# Altium PCB R20_PCBM.PcbDoc (part 2 of 2)
Units mm, origin at the board's own origin, x right, y up, seen from the top; angles counter-clockwise.
Board outline 52 x 61 mm, 4 copper layers (Top Layer, Mid-Layer 1, Mid-Layer 2, Bottom Layer); 64 components, 44 nets, 197 pads, 629 vias.
Unrouted connection lines stored in the file: 1.
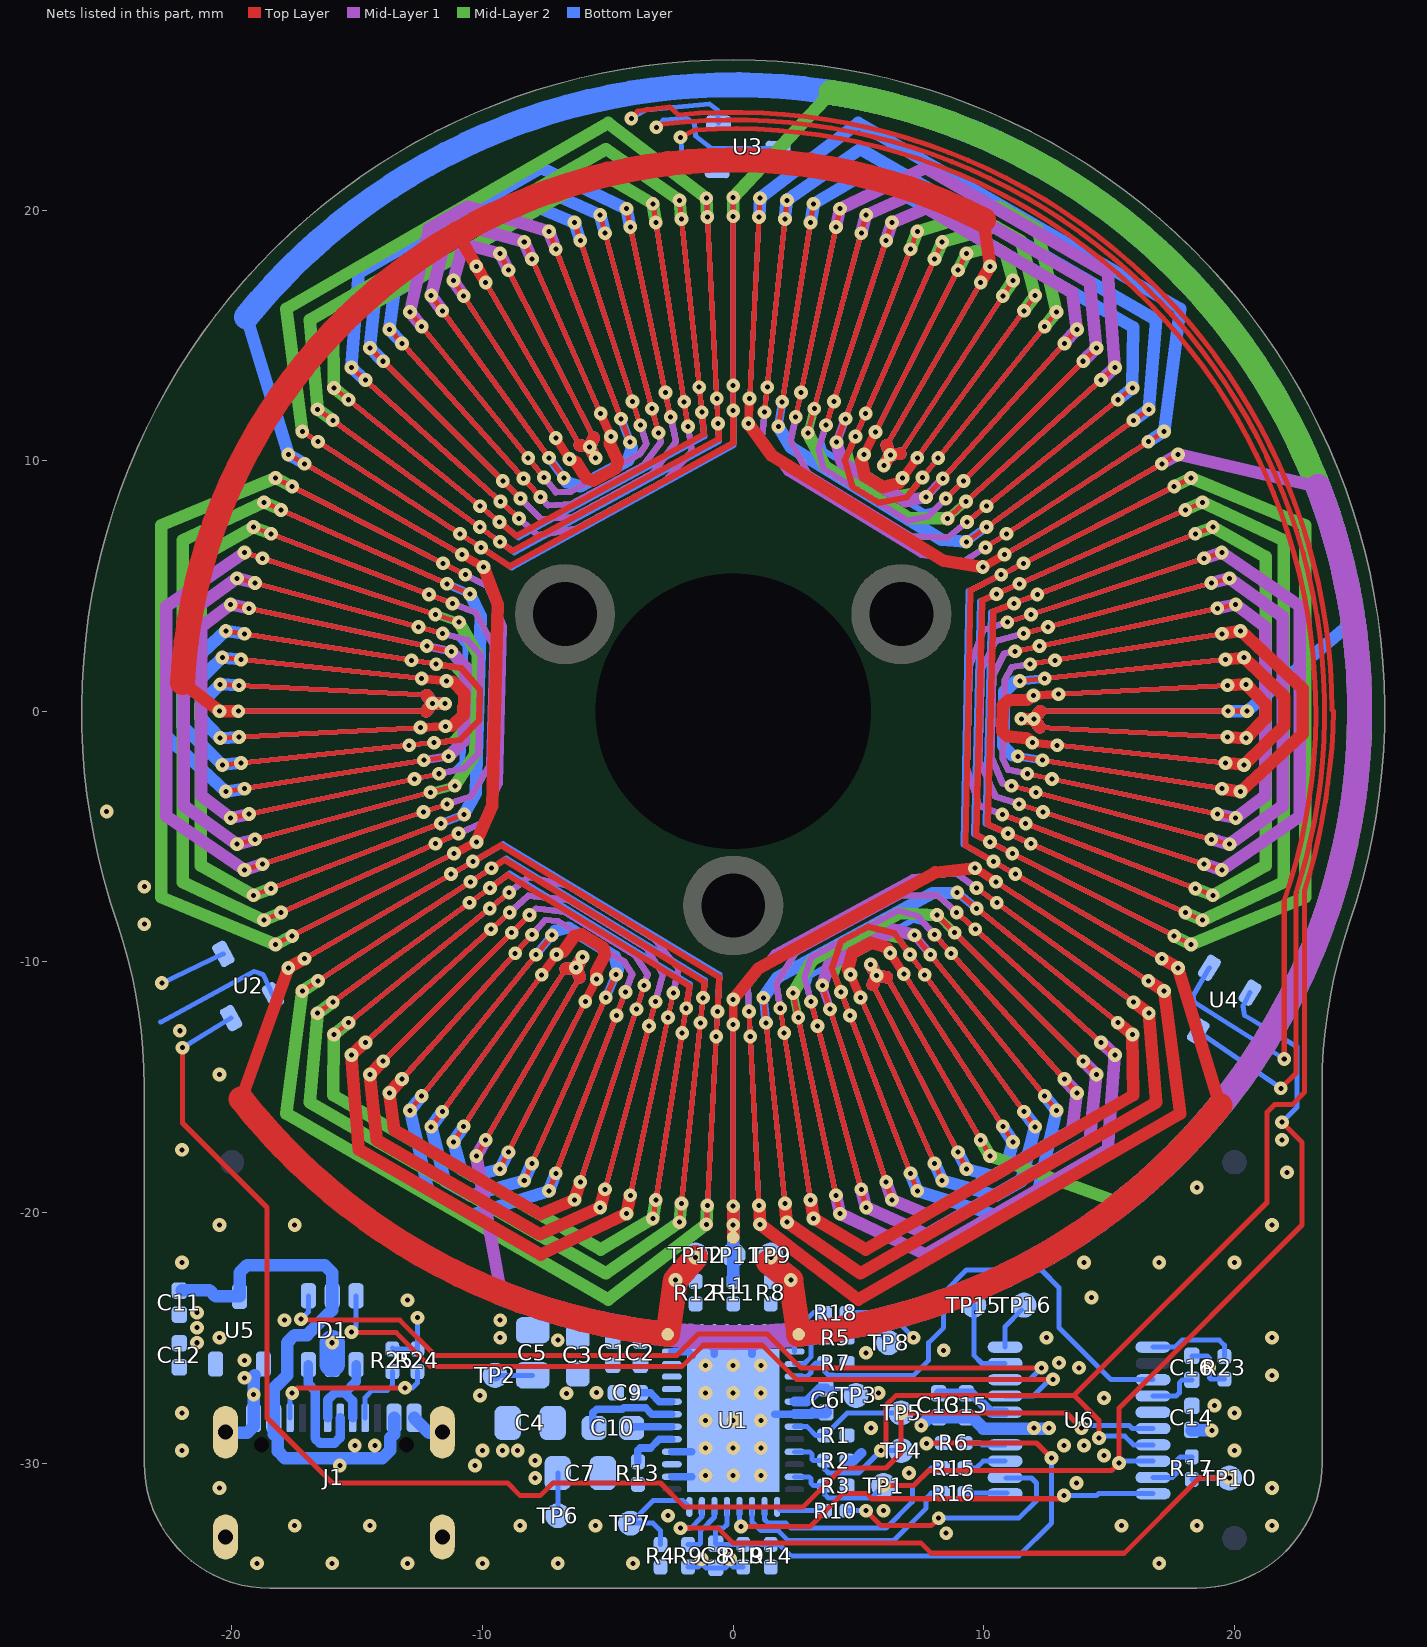
[diagram p4: the nets of this part, all layers, seen from the top]

## Part data
C1 C2 C8: library part C_0402, "0402 cap", LCSC=C307331, Rating=X7R, Voltage=50V
C3: library part C_0603, "0603 cap", LCSC=C15849, Rating=X5R, Voltage=50V
C4 C5 C7: library part C_0805, "0805 cap", LCSC=C440198, Rating=X5R, Voltage=50V
C6 C9: library part C_0402, "0402 cap", LCSC=C52923, Rating=X5R, Voltage=25V
C10: library part C_0603, "0603 cap", LCSC=C1622, Rating=X7R, Voltage=50V
C11: library part C_0402, "0402 cap", LCSC=C52923
C12: library part C_0402, "0402 cap", LCSC=C23733
C13 C14 C16: library part C_0402, "0402 cap", LCSC=C1525
C15: library part C_0402, "0402 cap", LCSC=C15195
D1: "Trans Voltage Suppressor Diode, 5V V(RWM), Unidirectional, 1 Element, Silicon", Clamping Voltage-Max=17V, Manufacturer=STMicroelectronics, Max Operating Temperature=125°C, Min Breakdown Voltage=6V, Min Operating Temperature=-40°C, Package Body Material=Plastic, Package Shape=Rectangular, Package Style="SMALL OUTLINEMeter", Peak Reflow Temperature (Cel)=260°C, Rep Pk Reverse Voltage-Max=5V, Supplier Part Number 1=511-USBLC6-2SC6, Additional Feature="HIGH RELIABILITY", Category="TVS Diodes", ComponentLink1Description=https://datasheet.ciiva.com:443/pdfs/VipMasterIC/IC/SGST/SGSTS30336/SGSTS30336-1.pdf?src-supplier=IHS+Markit, ComponentLink1URL=https://datasheet.ciiva.com:443/pdfs/VipMasterIC/IC/SGST/SGSTS30336/SGSTS30336-1.pdf?src-supplier=IHS+Markit, ComponentLink2Description=https://datasheet.ciiva.com/1268/1690354-1268384.pdf?src-supplier=Element14, ComponentLink2URL=https://datasheet.ciiva.com/1268/1690354-1268384.pdf?src-supplier=Element14, ComponentLink3Description=https://datasheet.ciiva.com/4508/cd00050750-113117-4508433.pdf?src-supplier=Mouser, ComponentLink3URL=https://datasheet.ciiva.com/4508/cd00050750-113117-4508433.pdf?src-supplier=Mouser, ComponentLink4Description=https://datasheet.ciiva.com/15143/getdatasheetpartid-148465-15143789.pdf?src-supplier=Verical, ComponentLink4URL=https://datasheet.ciiva.com/15143/getdatasheetpartid-148465-15143789.pdf?src-supplier=Verical, ComponentLink5Description=https://datasheet.ciiva.com/16200/cd00050750-16200026.pdf?src-supplier=Future+Electronics, ComponentLink5URL=https://datasheet.ciiva.com/16200/cd00050750-16200026.pdf?src-supplier=Future+Electronics, ComponentLink6Description=https://datasheet.ciiva.com/41444/001184109-da-01-en-ic-esd-protecti-usblc6-2sc6-sot-23-6-stm-41444156.pdf?src-supplier=Conrad, ComponentLink6URL=https://datasheet.ciiva.com/41444/001184109-da-01-en-ic-esd-protecti-usblc6-2sc6-sot-23-6-stm-41444156.pdf?src-supplier=Conrad, Diode Element Material=SILICON, Diode Type="TRANS VOLTAGE SUPPRESSOR", JESD-30 Code=R-PDSO-G6, JESD-609 Code=e3, Manufacturer Part Number=USBLC6-2SC6, Moisture Sensitivity Level=1, Number of Elements=1, Pins=6, Polarity=Unidirectional, Pricing 1="1=0.61, 10=0.522, 50=0.522, 100=0.375, 1000=0.258, 10000=0.204 (USD)", Qualification Status="Not Qualified", Reach SVHC Compliant=Yes, Reference Standard=IEC-61000-4-2, RoHS=Yes, RoHS Compliant=Yes, Stock 1=162692, Supplier 1=Mouser, Surface Mount=Yes, Technology=AVALANCHE, Terminal Finish=Tin, Terminal Form="Gull Wing", Terminal Position=DUAL
J1: library part TYPE-C-31-M-12, "Conn USB Type C PL 22 POS 0.5mm Solder ST SMD 22 Terminal 1Port Emboss T/R", LCSC=C165948, Manufacturer="HRO Electronics", Category=Uncategorized, Manufacturer Part Number=TYPE-C-31-M-12, Pricing 1="5=0.1612, 50=0.1282, 150=0.112, 1000=0.0977, 2000=0.0937, 5000=0.0913 (USD)", RoHS=No, Stock 1=6920, Supplier 1=LCSC, Supplier Part Number 1=C165948
L1: library part L_3phase
R1 R2 R3 R4 R5 R6 R7 R9 R18 R19: library part R_0402, "0402 62.5mW", LCSC=C25744
R8 R11 R12: library part R_0402, "0402 62.5mW", LCSC=C17168
R10 R15 R16 R17 R24 R25: library part R_0402, "0402 62.5mW", LCSC=?
R13: library part R_0402, "0402 62.5mW", LCSC=C25092
R14: library part R_0402, "0402 62.5mW", LCSC=C25756
R23: library part R_0402, "0402 62.5mW", LCSC=C11702
TP1 TP2 TP3 TP4 TP5 TP6 TP7 TP8 TP9 TP10 TP11 TP12 TP15 TP16: "1mm testing point"
U1: library part MCT8316ZR, "40-V max, 8-A peak, sensored trapezoidal control 3-phase BLDC motor driver 40-VQFN -40 to 125", Manufacturer="Texas Instruments", Manufacturer Part Number=MCT8316Z0TRGFR, Supplier Part Number=595-MCT8316Z0TRGFR, Category="Integrated Circuits (ICs)", Pricing="1=3.66, 10=3.22, 50=3.22, 100=2.69, 1000=1.94, 10000=1.83 (USD)", RoHS=No, Stock=5280, Supplier=Mouser
U2 U3 U4: "Hall Effect Sensor, -3.7mT Min, 3.7mT Max, 0-20mA, Plastic/epoxy, Rectangular, Surface Mount", LCSC=C2152442, Manufacturer="Texas Instruments", Manufacturer Part Number=DRV5015A3QDBZR, Supplier Part Number=595-DRV5015A3QDBZR, Category="Integrated Circuits (ICs)", ComponentLink1Description=https://www.ti.com:443/lit/ds/symlink/drv5015.pdf?src-supplier=IHS+Markit, ComponentLink1URL=https://www.ti.com:443/lit/ds/symlink/drv5015.pdf?src-supplier=IHS+Markit, ComponentLink2Description=http://www.ti.com/general/docs/suppproductinfo.tsp?distId=10&amp;gotoUrl=http%3A%2F%2Fwww.ti.com%2Flit%2Fgpn%2Fdrv5015&src-supplier=Digikey, ComponentLink2URL=http://www.ti.com/general/docs/suppproductinfo.tsp?distId=10&amp;gotoUrl=http%3A%2F%2Fwww.ti.com%2Flit%2Fgpn%2Fdrv5015&src-supplier=Digikey, JESD-609 Code=e3, Pricing="1=0.25, 10=0.175, 50=0.175, 100=0.154, 1000=0.124, 10000=0.123 (USD)", Reach SVHC Compliant=Yes, RoHS=Yes, RoHS Compliant=Yes, Sensor Type="MAGNETIC FIELD SENSOR,HALL EFFECT", Stock=7485, Supplier=Mouser, Terminal Finish=Tin
U5: library part XC6206P332MR-G, "200mA Fixed 3.3V Positive electrode 6V SOT-23-3L Voltage Regulators - Linear, Low Drop Out (LDO) Regulators ROHS", LCSC=C5446
U6: library part STM32F042F6P6TR, "32KB 1.65V~3.6V ARM-M0 48MHz 16 TSSOP-20(4.4x6.5) Microcontrollers (MCU/MPU/SOC) ROHS", LCSC=C2969989

## Free pads (board coordinates)
  round 0 hole 11 unplated: A3(0,0)
  round 4 hole 2.55: M(-6.712,3.875) M(0,-7.75) M(6.712,3.875)

## Via types
v1: diameter 0.55, hole 0.2, Top Layer to Bottom Layer, 614 vias
v2: diameter 0.55, hole 0.2, Top Layer to Bottom Layer, tented top, 15 vias

## Nets (pads, with @x,y where several pads share a name; then routed paths per layer and width w, separated by ;. In a path a pad name is that pad's centre, name@x,y a point inside that pad or via, vN(x,y) a via of type N, cw(c..) or ccw(c..) an arc to the next point about the centre after c; other vN are vias at no path point)
+3V3: C12.2 C13.2 C14.2 C15.2 R1.2 R2.2 R3.2 R4.2 R5.2 R7.2 R14.2 U2.1 U3.1 U4.1 U5.2 U6.5 U6.16 | length 70.2
  Top Layer w0.2: v1(-2.105,22.903) -1.521,23.2 cw(c0,0) 21.989,-7.553 v1(21.989,-13.874)
  Bottom Layer w0.2: -22.849,-12.406 -19.114,-10.378 -18.759,-10.505 U2.1@-18.366,-11.337 ; v1(-2.105,22.903) -2.013,21.908 -1.706,21.683 U3.1@-0.635,21.574 ; U4.1@19.001,-10.237 18.351,-11.347 18.395,-11.606 v1(21.989,-13.874)
  Bottom Layer w0.4: R2.2@4.55,-29.9 4.816,-29.9 5.125,-29.592 ; C13.2@8.2,-27.22 C15.2@9.3,-27.22 9.52,-27.22 10.275,-27.975 U6.16@10.85,-27.975
  other v1: -19,-34 -16,-34 -13,-34 -10,-34 -7,-34 -4,-34 17,-34 -20.5,-31 21.5,-31 7.012,-30.402 5.5,-28.6 -22,-28 20,-28 19.2,-27.7 14.8,-27.4 5.8,-27.2 13.8,-26.2 5.3,-25.6 8.4,-25.5 -20.5,-25 12.5,-25 21.5,-25 14.3,-23.4 -22,-22 14,-22 17,-22 20,-22 18.5,-19 22.1,-18.4 -23.5,-7 -25,-4
+AVDD: C6.2 TP3.1 U1.25 | length 2.8
  Bottom Layer w0.2: C6.2@3.7,-27.02 4.62,-27.02 TP3.1@4.9,-27.3
  Bottom Layer w0.4: U1.25@2.45,-27.55 2.93,-27.55 3.46,-27.02 C6.2@3.7,-27.02
+VBUS: C1.2 C2.2 C3.2 C4.2 C5.2 C9.1 C11.2 D1.5 J1.A4B9 J1.B4A9 TP2.1 U1.9 U1.10 U1.11 U5.3 | length 23.3
  Bottom Layer w0.2: TP2.1@-9.5,-26.5 C5.2@-8,-26.5
  Bottom Layer w0.5: C11.2@-22,-23.1 -20.9,-23.1 -20.65,-23.35 U5.3@-19.7,-23.35 -19.7,-22.4 -19.4,-22.1 -16.3,-22.1 -16,-22.4 D1.5@-16,-23.325 -16,-23.9 -17,-24.9 -17.5,-24.9 -17.8,-25.2 -17.8,-26.5 -18.334,-27.034 J1.B4A9@-18.334,-28.2 -18.334,-28.841 -18.174,-29.001 -18.174,-29.526 -17.9,-29.8 -14,-29.8 -13.694,-29.494 -13.694,-29.001 -13.534,-28.841 J1.A4B9@-13.534,-28.2
  other v1: -15.7,-30.1 -10.3,-30.1 -15.1,-29.3 -14.3,-29.3 -10.1,-27.3 -6.647,-27.219 -5.456,-27.193
A: L1.A R12.2 TP12.1 | length 3.4
  Top Layer w1: L1.A@-2.613,-24.863 v1(-2.3,-22.7) v1(-1.5,-21.8)
B: L1.B R11.2 TP11.1 | length 2.9
  Bottom Layer w0.5: R11.2@0,-22.75 TP11.1@0,-21.7 0,-21 0,-19.8
BRAKE: R9.2 U1.38 | length 2.2
  Bottom Layer w0.2: R9.2@-1.8,-33.25 -1.35,-33.25 -1.3,-33.2 -1.3,-32.7 -0.75,-32.15 U1.38@-0.75,-31.75
C: L1.C R8.2 TP9.1 | length 3.3
  Top Layer w1: v1@1.406,-21.987 v1(2.3,-22.7) L1.C@2.613,-24.863
  other v1: 1.5,-21.8 0,-20.5 -1.073,-20.472 1.073,-20.472 -2.143,-20.388 2.143,-20.388 -3.207,-20.248 3.207,-20.248 -4.262,-20.052 4.262,-20.052 -5.306,-19.801 5.306,-19.801 0,-19.75 -1.034,-19.723 1.034,-19.723 -2.064,-19.642 2.064,-19.642 -6.335,-19.497 -3.09,-19.507 3.09,-19.507 6.335,-19.497 -4.106,-19.318 4.106,-19.318 -7.347,-19.138 7.347,-19.138 -5.112,-19.077 5.112,-19.077 -6.103,-18.783 6.103,-18.783 -8.338,-18.728 8.338,-18.728 -7.078,-18.438 7.078,-18.438 -9.307,-18.266 9.307,-18.266 -8.033,-18.042 8.033,-18.042 -10.25,-17.754 10.25,-17.754 -8.966,-17.597 8.966,-17.597 -11.165,-17.193 11.165,-17.193 -9.875,-17.104 9.875,-17.104 -12.05,-16.585 12.05,-16.585 -10.757,-16.564 10.757,-16.564 -11.609,-15.978 11.609,-15.978 -12.901,-15.931 12.901,-15.931 -12.429,-15.349 12.429,-15.349 -13.717,-15.234 13.717,-15.234 -13.215,-14.677 13.215,-14.677 -14.496,-14.496 14.496,-14.496 -13.965,-13.965 13.965,-13.965 -15.234,-13.717 15.234,-13.717 -14.677,-13.215 14.677,-13.215 -0.68,-12.982 0.68,-12.982 -15.931,-12.901 15.931,-12.901 -2.034,-12.84 2.034,-12.84 -3.365,-12.557 3.365,-12.557 0,-12.5 -15.349,-12.429 -1.307,-12.431 1.307,-12.431 15.349,-12.429 -2.599,-12.227 2.599,-12.227 -4.659,-12.137 4.659,-12.137 -16.585,-12.05 16.585,-12.05 -0.628,-11.984 0.628,-11.984 -3.863,-11.888 3.863,-11.888 -1.877,-11.852 1.877,-11.852 -15.978,-11.609 15.978,-11.609 -5.902,-11.583 -3.106,-11.591 3.106,-11.591 0,-11.5 -5.084,-11.419 -1.202,-11.437 1.202,-11.437 5.084,-11.419 -2.391,-11.249 2.391,-11.249 -4.3,-11.203 4.3,-11.203 -17.193,-11.165 17.193,-11.165 -3.554,-10.937 3.554,-10.937 -16.564,-10.757 16.564,-10.757 -5.448,-10.692 5.726,-10.546 -7.641,-10.517 -4.677,-10.506 4.677,-10.506 7.641,-10.517 6.808,-10.483 -17.754,-10.25 17.754,-10.25 -6.27,-10.232 5.487,-10.106 -17.104,-9.875 17.104,-9.875 -6.009,-9.805 -7.866,-9.714 -7.053,-9.708 7.053,-9.708 7.866,-9.714 -8.699,-9.661 6.263,-9.645 8.699,-9.661 -18.266,-9.307 18.266,-9.307 -17.597,-8.966 17.597,-8.966 -7.237,-8.937 7.237,-8.937 -8.03,-8.918 8.03,-8.918 -8.839,-8.839 8.839,-8.839 -9.661,-8.699 9.661,-8.699 -18.728,-8.338 18.728,-8.338 -8.132,-8.132 8.132,-8.132 -18.042,-8.033 -8.918,-8.03 8.918,-8.03 18.042,-8.033 -9.714,-7.866 9.714,-7.866 -10.517,-7.641 10.517,-7.641 -19.138,-7.347 19.138,-7.347 -8.937,-7.237 8.937,-7.237 -18.438,-7.078 18.438,-7.078 -9.708,-7.053 9.708,-7.053 -10.483,-6.808 10.483,-6.808 -11.258,-6.5 11.258,-6.5 -19.497,-6.335 19.497,-6.335 -9.645,-6.263 9.645,-6.263 -18.783,-6.103 18.783,-6.103 -10.392,-6 10.392,-6 -11.138,-5.675 11.138,-5.675 -19.801,-5.306 19.801,-5.306 -11.876,-5.288 11.876,-5.288 -10.247,-5.221 10.247,-5.221 -19.077,-5.112 19.077,-5.112 -10.963,-4.881 10.963,-4.881 -11.67,-4.48 11.67,-4.48 -20.052,-4.262 20.052,-4.262 -19.318,-4.106 -10.736,-4.121 10.736,-4.121 19.318,-4.106 -12.364,-4.017 12.364,-4.017 -11.413,-3.708 11.413,-3.708 -12.074,-3.235 12.074,-3.235 -20.248,-3.207 20.248,-3.207 -19.507,-3.09 19.507,-3.09 -11.108,-2.976 11.108,-2.976 -12.716,-2.703 12.716,-2.703 -11.738,-2.495 11.738,-2.495 -20.388,-2.143 20.388,-2.143 -19.642,-2.064 19.642,-2.064 -12.346,-1.955 12.346,-1.955 -11.358,-1.799 11.358,-1.799 -12.929,-1.359 12.929,-1.359 -11.934,-1.254 11.934,-1.254 -20.472,-1.073 20.472,-1.073 -19.723,-1.034 19.723,-1.034 -12.483,-0.654 -11.484,-0.602 11.496,-0.301 11.996,-0.314 -20.5,0 -19.75,0 19.75,0 20.5,0 -11.996,0.314 -11.496,0.301 11.984,0.628 12.982,0.68 -19.723,1.034 19.723,1.034 -20.472,1.073 20.472,1.073 -11.437,1.202 11.437,1.202 -12.431,1.307 12.431,1.307 -11.852,1.877 11.852,1.877 -12.84,2.034 12.84,2.034 -19.642,2.064 19.642,2.064 -20.388,2.143 20.388,2.143 -11.249,2.391 11.249,2.391 -12.227,2.599 12.227,2.599 -19.507,3.09 -11.591,3.106 11.591,3.106 19.507,3.09 -20.248,3.207 20.248,3.207 -12.557,3.365 12.557,3.365 -10.937,3.554 10.937,3.554 -11.888,3.863 11.888,3.863 -19.318,4.106 19.318,4.106 -20.052,4.262 20.052,4.262 -11.203,4.3 11.203,4.3 -12.137,4.659 12.137,4.659 -10.506,4.677 10.506,4.677 -11.419,5.084 11.419,5.084 -19.077,5.112 19.077,5.112 -19.801,5.306 19.801,5.306 -10.692,5.448 10.692,5.448 -9.959,5.75 9.959,5.75 -11.583,5.902 11.583,5.902 -18.783,6.103 18.783,6.103 -10.825,6.25 10.825,6.25 -19.497,6.335 19.497,6.335 -10.064,6.536 10.064,6.536 -9.304,6.76 9.304,6.76 -18.438,7.078 -10.903,7.08 10.903,7.08 18.438,7.078 -19.138,7.347 -10.113,7.347 10.113,7.347 19.138,7.347 -9.326,7.552 9.326,7.552 -8.546,7.695 8.546,7.695 -18.042,8.033 18.042,8.033 -10.103,8.181 10.103,8.181 -18.728,8.338 18.728,8.338 -9.289,8.364 9.289,8.364 -8.485,8.485 8.485,8.485 -7.695,8.546 7.695,8.546 -17.597,8.966 17.597,8.966 -9.192,9.192 9.192,9.192 -18.266,9.307 -8.364,9.289 -6.76,9.304 6.76,9.304 8.364,9.289 18.266,9.307 -7.552,9.326 7.552,9.326 6.009,9.805 -17.104,9.875 17.104,9.875 -6.536,10.064 -8.181,10.103 -7.347,10.113 -5.487,10.106 7.347,10.113 8.181,10.103 5.221,10.247 6.27,10.232 -17.754,10.25 17.754,10.25 -5.726,10.546 -16.564,10.757 -4.121,10.736 4.121,10.736 16.564,10.757 -7.08,10.903 -4.881,10.963 4.881,10.963 -2.976,11.108 2.976,11.108 5.675,11.138 -17.193,11.165 17.193,11.165 -1.799,11.358 1.799,11.358 -3.708,11.413 3.708,11.413 -0.602,11.484 0.602,11.484 -15.978,11.609 15.978,11.609 -4.48,11.67 4.48,11.67 -2.495,11.738 2.495,11.738 -5.288,11.876 5.288,11.876 -1.254,11.934 1.254,11.934 0,12 -16.585,12.05 16.585,12.05 -3.235,12.074 3.235,12.074 -1.955,12.346 1.955,12.346 -4.017,12.364 4.017,12.364 -15.349,12.429 15.349,12.429 -0.654,12.483 0.654,12.483 -2.703,12.716 2.703,12.716 -15.931,12.901 15.931,12.901 -1.359,12.929 1.359,12.929 0,13 -14.677,13.215 14.677,13.215 -15.234,13.717 15.234,13.717 -13.965,13.965 13.965,13.965 -14.496,14.496 14.496,14.496 -13.215,14.677 13.215,14.677 -13.717,15.234 13.717,15.234 -12.429,15.349 12.429,15.349 -12.901,15.931 12.901,15.931 -11.609,15.978 11.609,15.978 -10.757,16.564 10.757,16.564 -12.05,16.585 12.05,16.585 -9.875,17.104 9.875,17.104 -11.165,17.193 11.165,17.193 -8.966,17.597 8.966,17.597 -10.25,17.754 10.25,17.754 -8.033,18.042 8.033,18.042 -9.307,18.266 9.307,18.266 -7.078,18.438 7.078,18.438 -8.338,18.728 8.338,18.728 -6.103,18.783 6.103,18.783 -5.112,19.077 5.112,19.077 -7.347,19.138 7.347,19.138 -4.106,19.318 4.106,19.318 -6.335,19.497 -3.09,19.507 3.09,19.507 6.335,19.497 -2.064,19.642 2.064,19.642 -1.034,19.723 1.034,19.723 0,19.75 -5.306,19.801 5.306,19.801 -4.262,20.052 4.262,20.052 -3.207,20.248 3.207,20.248 -2.143,20.388 2.143,20.388 -1.073,20.472 1.073,20.472 0,20.5
DRVOFF: R18.2 U1.21 | length 2.3
  Bottom Layer w0.2: U1.21@2.45,-25.55 2.45,-24.75 3.2,-24 R18.2@3.65,-24
FGOUT: R4.1 TP7.1 U1.40 | length 4.7
  Bottom Layer w0.2: R4.1@-2.9,-33.25 -2.9,-32.7 -3.2,-32.4 TP7.1@-4.1,-32.4 -3.2,-31.5 -2,-31.5 U1.40@-1.75,-31.75
GND: C1.1 C2.1 C3.1 C4.1 C5.1 C6.1 C7.1 C8.1 C11.1 C12.1 C13.1 C14.1 C15.1 C16.1 D1.2 J1.A1B12 J1.B1A12 J1.M1 R9.1 R18.1 R19.1 R23.1 R24.1 R25.1 TP6.1 U1.2 U1.4 U1.12 U1.15 U1.18 U1.26 U1.41 U2.3 U3.3 U4.3 U5.1 U6.15 | length 97.9
  Top Layer w0.2: v1(-3.067,23.299) -2.774,23.436 cw(c0,0) 23.313,-3.671 cw(c0.252,-0.04) 22.467,-7.215 22.467,-14.433 v1(21.852,-15.048)
  Bottom Layer w0.2: v1(-22.8,-10.849) U2.3@-20.346,-9.681 ; R25.1@-13.6,-25.4 -13.55,-25.45 R24.1@-12.6,-25.45 ; R24.1@-12.6,-25.4 v1(-12.6,-24.2) ; TP6.1@-7,-32.1 C7.1@-7,-30.4 ; v1(-3.067,23.299) -2.792,23.585 -1.863,23.677 -1.537,23.45 -1.504,22.951 -0.883,22.483 U3.3@1.789,22.461 ; R9.1@-1.8,-34.15 -1.4,-34.15 -1.267,-34.017 v1(-1.267,-33.826) ; v1@-1.225,-34.05 -1.095,-34.18 C8.1@-0.7,-34.18 -0.305,-34.18 v1@-0.175,-34.05 ; v1(-0.133,-33.826) -0.133,-34.017 0,-34.15 R19.1@0.4,-34.15 ; R18.1@4.55,-24 6.2,-24 v1(7.2,-25) ; C16.1@18.3,-25.72 18.92,-25.72 19,-25.8 v1(19,-26.2) 19,-26.6 19.05,-26.65 R23.1@19.6,-26.65 ; U4.3@18.557,-12.779 v1(21.852,-15.048)
  Bottom Layer w0.3: U1.2@-2.45,-30.55 U1.41@-1.65,-30.55 ; U1.4@-2.45,-29.55 U1.41@-1.65,-29.55 ; U1.12@-2.45,-25.55 -1.79,-25.55 U1.41@-1.626,-25.714 ; U1.41@-0.75,-25.65 U1.15@-0.75,-24.85 ; U1.41@0.75,-25.65 U1.18@0.75,-24.85 ; U1.41@1.65,-28.05 U1.26@2.45,-28.05
  Bottom Layer w0.4: U1.26@2.45,-28.05 3.137,-28.05 3.207,-27.98 3.278,-27.98
  Bottom Layer w0.5: J1.M1@-20.3,-28.8 -19.4,-28.8 -19.134,-28.534 J1.B1A12@-19.134,-28.2 -19.134,-26.534 -19.1,-26.5 ; J1.A1B12@-12.734,-28.2 -12.134,-28.8 J1.M1@-11.5,-28.8 ; 3.278,-27.98 C6.1@3.7,-27.98 ; v1(7.5,-28.5) 7.82,-28.18 C13.1@8.2,-28.18 C15.1@9.3,-28.18 9.54,-28.18 9.985,-28.625 U6.15@10.85,-28.625 12.575,-28.625 v1(12.6,-28.6) ; C14.1@18.3,-28.7 v1(19.1,-28.7)
  Bottom Layer w1: D1.2@-16,-26.075 v1(-16,-25.2)
  other v1: 8.5,-32.8 -17.5,-32.5 -14.5,-32.5 -8.5,-32.5 -5.5,-32.5 15.5,-32.5 18.5,-32.5 21.5,-32.5 -2.6,-32.1 6,-31.9 13.7,-30.8 -7.9,-30.6 -7.9,-29.9 14.8,-29.7 -22,-29.5 -10,-29.5 -9.2,-29.5 -8.6,-29.5 20,-29.5 13.2,-29.3 14,-29.3 12,-28.6 -19.136,-27.268 -19.5,-26.6 21.5,-26.5 13,-26 -19.5,-25.9 -21.4,-25.2 -7,-25.1 -9.3,-25 -21.4,-24.6 -17.9,-24.3 -9.3,-24.3 -21.4,-24 -13,-23.5 -20.5,-20.5 -17.5,-20.5 21.5,-20.5 -22,-17.5 21.9,-17.1 -20.5,-14.5 -22.084,-12.75 -23.5,-8.5
  other v2: -1.1,-30.5 0,-30.5 1.1,-30.5 -1.1,-29.4 0,-29.4 1.1,-29.4 -1.1,-28.3 0,-28.3 1.1,-28.3 -1.1,-27.2 0,-27.2 1.1,-27.2 -1.1,-26.1 0,-26.1 1.1,-26.1
HALL_A: R1.1 TP5.1 U1.27 U2.2 U6.6 | length 63.3
  Top Layer w0.2: v1(-21.972,-13.427) -21.972,-16.428 -18.6,-19.8 -18.6,-28.2 -16,-30.8 -9,-30.8 -8.5,-31.3 -7.7,-31.3 -7.2,-30.8 -2.9,-30.8 -1.95,-31.75 2.8,-31.75 4.35,-30.2 6.1,-30.2 6.7,-29.6 6.7,-28.7 v1(6.7,-28) 13.3,-28 v1(13.9,-28.6)
  Bottom Layer w0.2: v1(-21.972,-13.427) U2.2@-20.036,-12.244 ; U1.27@2.45,-28.55 2.95,-28.55 3.3,-28.9 R1.1@3.65,-28.9 4.55,-28 v1(6.7,-28) ; v1(13.9,-28.6) 14,-28.5 15.8,-28.5 15.925,-28.625 U6.6@16.75,-28.625
HALL_B: R2.1 TP4.1 U1.29 U3.2 U6.7 | length 97
  Top Layer w0.2: v1(-4.064,23.653) -3.794,23.951 -2.535,24.117 -2.188,23.8 cw(c0,0) 23.9,0.05 23.95,0 cw(c5.312,0) 23.725,-2.889 cw(c0,0) 22.8,-7.167 22.8,-15.204 22.304,-15.7 21.6,-15.7 21.3,-16 21.3,-19.6 13.6,-27.3 ; v1(5.9,-29.5) 6.1,-29.3 6.1,-27.7 6.5,-27.3 13.6,-27.3 ; v1(14.6,-29) 14.6,-28.3 13.6,-27.3
  Bottom Layer w0.2: v1(-4.064,23.653) -3.48,23.999 -0.952,24.231 -0.628,23.992 U3.2@-0.586,23.473 ; U1.29@2.45,-29.55 3.047,-29.55 3.15,-29.653 3.15,-29.85 3.2,-29.9 R2.1@3.65,-29.9 3.65,-30.25 3.8,-30.4 5,-30.4 v1(5.9,-29.5) TP4.1@6.7,-29.5 ; v1(14.6,-29) 14.675,-28.925 15.625,-28.925 15.975,-29.275 U6.7@16.75,-29.275
HALL_C: R3.1 TP1.1 U1.31 U4.2 U6.8 | length 39.2
  Top Layer w0.2: v1(6,-30.9) 7.2,-30.9 7.8,-30.3 15.1,-30.3 v1(15.4,-30) 15.4,-27.8 22.7,-20.5 22.7,-17.2 v1(21.9,-16.4)
  Bottom Layer w0.2: U1.31@2.45,-30.55 3.025,-30.55 3.1,-30.625 3.1,-30.8 3.2,-30.9 R3.1@3.65,-30.9 3.65,-31.25 3.8,-31.4 5.5,-31.4 v1(6,-30.9) ; v1(15.4,-30) 15.475,-29.925 U6.8@16.75,-29.925 ; U4.2@20.621,-11.229 20.352,-11.75 20.411,-12.143 22.499,-13.386 22.499,-15.801 v1(21.9,-16.4)
ILIM: C8.2 R6.1 R14.1 R19.2 U1.37 | length 24.4
  Top Layer w0.2: v1(7.712,-29.216) 7.728,-29.2 12.1,-29.2 v1(12.7,-29.8)
  Bottom Layer w0.2: U1.37@-0.25,-31.75 -0.25,-32.45 -0.4,-32.6 -0.6,-32.6 -0.7,-32.7 C8.2@-0.7,-33.22 -0.67,-33.25 R19.2@0.4,-33.25 R14.1@1.5,-33.25 1.85,-33.25 2.3,-33.7 11.4,-33.7 12.7,-32.4 v1(12.7,-29.8) ; v1(7.712,-29.216) 8.334,-29.216 R6.1@8.35,-29.2
ILIM_MCU: R6.2 U6.14 | length 1.6
  Bottom Layer w0.2: R6.2@9.25,-29.2 9.85,-29.2 9.925,-29.275 U6.14@10.85,-29.275
NetC7_2: C7.2 R13.2 U1.3
NetC9_2: C9.2 U1.8 | length 1.4
  Bottom Layer w0.3: C9.2@-3.7,-27.2 -3.3,-27.2 -2.95,-27.55 U1.8@-2.45,-27.55
NetC10_1: C10.1 U1.6 | length 1.6
  Bottom Layer w0.3: C10.1@-4,-28.6 -3.95,-28.55 U1.6@-2.45,-28.55
NetC10_2: C10.2 U1.7 | length 3.9
  Bottom Layer w0.3: C10.2@-5.6,-28.6 -5.6,-28 -5.45,-27.85 -4.419,-27.85 -4.369,-27.8 -3.5,-27.8 -3.25,-28.05 U1.7@-2.45,-28.05
NetC16_2: C16.2 U6.4 | length 2.1
  Bottom Layer w0.2: U6.4@16.75,-27.325 17.675,-27.325 17.8,-27.2 17.8,-26.8 17.92,-26.68 C16.2@18.3,-26.68
NetD1_1: D1.1 J1.A7 J1.B7 | length 4
  Bottom Layer w0.381: J1.A7@-16.184,-28.2 -16.184,-27.484 -15.9,-27.2 -15.5,-27.2 ; J1.B7@-15.184,-28.2 -15.184,-27.516 -15.5,-27.2 ; D1.1@-15.05,-26.075 -15.05,-26.75 -15.5,-27.2
NetD1_3: D1.3 J1.A6 J1.B6 | length 5
  Bottom Layer w0.381: D1.3@-16.95,-26.075 -16.95,-26.85 -16.684,-27.116 J1.B6@-16.684,-28.2 -16.684,-29.016 -16.5,-29.2 -15.9,-29.2 -15.684,-28.984 J1.A6@-15.684,-28.2
NetJ1_A5: J1.A5 R25.2 | length 2.7
  Bottom Layer w0.2: J1.A5@-14.684,-28.2 -14.684,-27.384 -14.4,-27.1 -13.8,-27.1 -13.6,-26.9 R25.2@-13.6,-26.35
NetJ1_B5: J1.B5 R24.2 | length 6.7
  Top Layer w0.2: v1(-17.6,-27.2) -17.4,-27 v1(-13.1,-27)
  Bottom Layer w0.2: J1.B5@-17.684,-28.2 -17.684,-27.284 v1(-17.6,-27.2) ; v1(-13.1,-27) -12.8,-27 -12.6,-26.8 R24.2@-12.6,-26.35
NetR8_1: R8.1 U1.19 U1.20
NetR10_1: R10.1 U1.33 | length 2
  Bottom Layer w0.2: U1.33@1.75,-31.75 1.9,-31.9 R10.1@3.65,-31.9
NetR11_1: R11.1 U1.16 U1.17
NetR12_1: R12.1 U1.13 U1.14
NetR13_1: R13.1 U1.5 | length 2
  Bottom Layer w0.3: R13.1@-3.8,-29.95 -3.8,-29.5 -3.7,-29.4 -3.3,-29.4 -2.95,-29.05 U1.5@-2.45,-29.05
NetR15_1: R15.1 U6.13 | length 1.7
  Bottom Layer w0.2: R15.1@9.25,-30.2 9.7,-30.2 9.975,-29.925 U6.13@10.85,-29.925
NetR16_1: R16.1 U6.11 | length 1.7
  Bottom Layer w0.2: R16.1@9.25,-31.2 9.7,-31.2 U6.11@10.915,-31.2
NetR17_1: R17.1 U6.9 | length 2.2
  Bottom Layer w0.2: U6.9@16.75,-30.575 17.525,-30.575 17.7,-30.4 17.7,-29.9 17.85,-29.75 R17.1@18.3,-29.75
NetR23_2: R23.2 U6.1 | length 3.5
  Bottom Layer w0.2: U6.1@16.75,-25.375 17.625,-25.375 17.9,-25.1 19.4,-25.1 19.6,-25.3 R23.2@19.6,-25.75
nFAULT: R5.1 TP8.1 U1.22 | length 5.1
  Bottom Layer w0.2: U1.22@2.45,-26.05 2.826,-26.05 3.1,-25.776 3.1,-25.2 3.2,-25.1 R5.1@3.65,-25.1 ; R5.1@3.65,-25 3.65,-24.75 3.9,-24.5 5.5,-24.5 TP8.1@6.2,-25.2
nSCS: U1.36 U6.10 | length 18
  Top Layer w0.2: v1(0.313,-32.537) 3.063,-32.537 4.375,-31.225 4.875,-31.225 5.325,-31.225 5.525,-31.425 13.075,-31.425 v1(13.2,-31.3)
  Bottom Layer w0.2: U1.36@0.25,-31.75 0.25,-32.35 0.375,-32.475 v1(0.313,-32.537) ; v1(13.2,-31.3) 14.5,-31.3 14.575,-31.225 U6.10@16.75,-31.225
nSLEEP: R7.1 U1.23 U6.3 | length 20.8
  Bottom Layer w0.2: U1.23@2.45,-26.55 2.95,-26.55 3.1,-26.4 3.1,-26.2 3.3,-26 R7.1@3.65,-26 3.65,-26.35 3.79,-26.49 4.002,-26.49 4.012,-26.5 7.2,-26.5 7.8,-25.9 7.8,-25.2 8.4,-24.6 8.4,-23.2 9.3,-22.3 12.3,-22.3 13,-23 13,-24.6 15.075,-26.675 U6.3@16.75,-26.675
PWM: R17.2 TP10.1 U1.39 | length 26.5
  Top Layer w0.2: v1(-2.1,-32.6) -0.6,-32.6 0,-33.2 7.5,-33.2 7.9,-33.6 15.6,-33.6 18.6,-30.6 v1(19.8,-30.6)
  Bottom Layer w0.2: v1(-2.1,-32.6) -1.7,-32.6 -1.25,-32.15 U1.39@-1.25,-31.75 ; R17.2@18.3,-30.65 18.35,-30.6 v1(19.8,-30.6)
SCLK: R16.2 U1.35 | length 9.5
  Bottom Layer w0.2: U1.35@0.75,-31.75 0.75,-32.35 1.1,-32.7 1.8,-32.7 2.2,-33.1 6.4,-33.1 7.7,-31.8 7.7,-31.4 7.9,-31.2 R16.2@8.35,-31.2
SDI: R15.2 U1.34 | length 9.1
  Bottom Layer w0.2: U1.34@1.25,-31.75 1.25,-32.25 1.4,-32.4 2.1,-32.4 2.3,-32.6 5.5,-32.6 6.1,-32.6 7.15,-31.55 7.15,-30.95 7.9,-30.2 R15.2@8.35,-30.2
SDO: R10.2 U6.12 | length 10.2
  Top Layer w0.2: v1(5.3,-31.9) 5.9,-32.5 7.9,-32.5 v1(8.2,-32.2)
  Bottom Layer w0.2: R10.2@4.55,-31.9 v1(5.3,-31.9) ; v1(8.2,-32.2) 11.4,-32.2 12.1,-31.5 12.1,-30.8 11.9,-30.6 U6.12@10.876,-30.6
SWCLK: TP16.1 U6.20 | length 1.7
  Bottom Layer w0.2: U6.20@10.85,-25.375 10.85,-24.55 TP16.1@11.5,-23.9
SWDIO: TP15.1 U6.19 | length 3.4
  Bottom Layer w0.2: TP15.1@9.6,-23.7 9.6,-25.7 9.925,-26.025 U6.19@10.85,-26.025
USB_D_N: D1.6 U6.17 | length 33.3
  Top Layer w0.2: v1(-15.235,-24.775) -15.235,-24.8 -13.442,-24.8 -12.088,-26.154 -2.054,-26.154 -1.2,-25.3 1.158,-25.3 2.518,-26.66 12.088,-26.66 12.103,-26.675 12.497,-26.675 12.512,-26.66 v1(12.76,-26.66)
  Bottom Layer w0.2: v1(-15.235,-24.775) -15.05,-24.59 D1.6@-15.05,-23.325 ; U6.17@10.85,-27.325 11.975,-27.325 12.7,-26.6 v1(12.76,-26.66)
USB_D_P: D1.4 U6.18 | length 33.8
  Top Layer w0.2: v1(-17.242,-24.258) -17.2,-24.3 -13.3,-24.3 -11.9,-25.7 -2.242,-25.7 -1.388,-24.846 1.346,-24.846 2.7,-26.2 v1(12.3,-26.2)
  Bottom Layer w0.2: v1(-17.242,-24.258) -16.95,-23.966 D1.4@-16.95,-23.325 ; U6.18@10.85,-26.675 11.825,-26.675 v1(12.3,-26.2)
pads on no net: FD1.1 FD2.1 FD3.1 J1.A8 J1.B8 J1.H U1.1 U1.24 U1.28 U1.30 U1.32 U6.2
copper on no net:
  other v1: 0,-9.35 -1.131,-8.881 1.131,-8.881 -1.6,-7.75 1.6,-7.75 -1.131,-6.619 1.131,-6.619 0,-6.15 -6.298,2.33 6.298,2.33 -7.512,2.489 7.512,2.489 -5.326,3.075 5.326,3.075 -8.257,3.461 8.257,3.461 -5.166,4.289 5.166,4.289 -8.097,4.675 8.097,4.675 -5.912,5.261 5.912,5.261 -7.126,5.42 7.126,5.42

## Polygon pours and split planes (outlines as drawn)
+3V3 on Bottom Layer "+3V3_L04_P006" (solid, remove dead copper, pour order 6): -27.1,-36.6 27.1,-36.6 27.1,0 23.5,0 cw(c0,0) -23.5,0 -27.1,0
+VBUS on Bottom Layer "NONET_L-01_P-001" (solid, remove dead copper, pour order 5): -3.1,-30.9 -18.8,-30.9 -18.8,-21.867 -10.81,-21.867 cw(c-10.81,-22.61) -10.067,-22.61 -10.067,-25.233 ccw(c-9.6,-25.233) -9.6,-25.7 -3.1,-25.7 -3.1,-30.5
GND on Bottom Layer "NONET_L-01_P-001" (solid, remove dead copper, pour order 4): -19.7,-25.2 ccw(c-19.7,-25.4) -19.9,-25.4 -19.9,-26.8 ccw(c-19.7,-26.8) -19.7,-27 -18.1,-27 ccw(c-18.1,-26.8) -17.9,-26.8 -17.9,-25.4 ccw(c-18.1,-25.4) -18.1,-25.2
+3V3 on Top Layer "+3V3_L01_P008" (solid, remove dead copper, pour order 8): -27.1,-36.6 27.1,-36.6 27.1,0 23.5,0 cw(c0,0) -23.5,0 -27.1,0
+VBUS on Top Layer "+VBUS_L01_P007" (solid, remove dead copper, pour order 7): -3.1,-30.9 -18.8,-30.9 -18.8,-21.867 -10.81,-21.867 cw(c-10.81,-22.61) -10.067,-22.61 -10.067,-25.233 ccw(c-9.6,-25.233) -9.6,-25.7 -3.1,-25.7 -3.1,-30.5
GND on Mid-Layer 1 "NONET_L-01_P-001" (solid, remove dead copper, pour order 2): -27.1,-36.6 27.1,-36.6 27.1,0 23.5,0 cw(c0,0) -23.5,0 -27.1,0
GND on Mid-Layer 2 "NONET_L-01_P-001" (solid, remove dead copper, pour order 3): -27.1,-36.6 27.1,-36.6 27.1,0 23.5,0 cw(c0,0) -23.5,0 -27.1,0

## Other copper
Bottom Layer:
  region net A: -1,-21.7 ccw(c-1.5,-21.7) -1.5,-21.2 ccw(c-1.5,-21.683) -1.841,-21.341 -2.759,-22.259 ccw(c-2.417,-22.6) -2.9,-22.6 -2.9,-22.9 ccw(c-2.7,-22.9) -2.7,-23.1 -1.2,-23.1 ccw(c-1.2,-22.9) -1,-22.9
  region net +3V3: 20.946,-23.495 cw(c20.755,-23.495) 20.563,-23.495 20.563,-23.11 ccw(c20.468,-23.11) 20.372,-23.11 20.372,-23.495 cw(c20.181,-23.495) 19.989,-23.495 19.989,-23.11 ccw(c19.894,-23.11) 19.798,-23.11 19.798,-23.495 cw(c19.607,-23.495) 19.415,-23.495 19.415,-23.11 ccw(c19.32,-23.11) 19.224,-23.11 19.224,-23.495 cw(c19.033,-23.495) 18.841,-23.495 18.841,-23.433 ccw(c18.745,-23.433) 18.745,-23.338 18.383,-23.338 18.364,-23.338 ccw(c18.383,-24.246) 17.74,-23.604 17.547,-23.797 cw(c16.837,-23.086) 16.837,-24.091 14.219,-24.091 cw(c14.219,-24.043) 14.171,-24.043 cw(c14.219,-24.043) 14.219,-23.995 16.837,-23.995 ccw(c16.837,-23.086) 17.479,-23.729 17.672,-23.536 cw(c18.383,-24.246) 18.362,-23.242 18.383,-23.242 18.745,-23.242 cw(c18.745,-23.433) 18.937,-23.433 18.937,-23.495 ccw(c19.033,-23.495) 19.128,-23.495 19.128,-23.11 cw(c19.32,-23.11) 19.511,-23.11 19.511,-23.495 ccw(c19.607,-23.495) 19.702,-23.495 19.702,-23.11 cw(c19.894,-23.11) 20.085,-23.11 20.085,-23.495 ccw(c20.181,-23.495) 20.276,-23.495 20.276,-23.11 cw(c20.468,-23.11) 20.659,-23.11 20.659,-23.495 ccw(c20.755,-23.495) 20.85,-23.495 20.85,-23.11 cw(c21.042,-23.11) 21.233,-23.11 21.233,-23.146 ccw(c21.329,-23.146) 21.329,-23.242 21.754,-23.242 cw(c21.754,-23.29) 21.754,-23.338 21.329,-23.338 cw(c21.329,-23.146) 21.138,-23.146 21.138,-23.11 ccw(c21.042,-23.11) 20.946,-23.11
  region net +3V3: 21.754,-21.735 17.629,-21.735 cw(c17.629,-20.826) 16.987,-21.469 16.48,-20.961 16.479,-20.961 cw(c16.547,-20.894) 16.452,-20.894 cw(c16.547,-20.894) 16.479,-20.827 16.48,-20.826 16.953,-20.353 16.953,-20.352 ccw(c16.818,-20.217) 16.953,-20.082 ccw(c16.818,-20.217) 16.683,-20.082 16.682,-20.082 15.532,-21.232 cw(c15.465,-21.165) 15.397,-21.232 cw(c15.465,-21.165) 15.369,-21.165 cw(c15.465,-21.165) 15.397,-21.097 16.442,-20.052 ccw(c16.306,-19.917) 16.442,-19.781 ccw(c16.306,-19.917) 16.171,-19.781 15.126,-20.826 cw(c15.059,-20.759) 14.991,-20.826 cw(c15.059,-20.759) 14.963,-20.759 cw(c15.059,-20.759) 14.991,-20.691 15.127,-20.555 15.128,-20.555 ccw(c14.992,-20.419) 14.992,-20.228 14.219,-20.228 ccw(c14.219,-20.276) 14.171,-20.276 ccw(c14.219,-20.276) 14.219,-20.324 14.992,-20.324 cw(c14.992,-20.419) 15.06,-20.487 15.059,-20.487 14.923,-20.623 ccw(c15.059,-20.759) 14.867,-20.759 ccw(c15.059,-20.759) 14.923,-20.894 ccw(c15.059,-20.759) 15.194,-20.894 16.239,-19.849 cw(c16.306,-19.917) 16.374,-19.849 cw(c16.306,-19.917) 16.374,-19.984 15.329,-21.029 ccw(c15.465,-21.165) 15.273,-21.165 ccw(c15.465,-21.165) 15.329,-21.3 ccw(c15.465,-21.165) 15.6,-21.3 16.75,-20.15 cw(c16.818,-20.217) 16.885,-20.15 16.886,-20.15 cw(c16.818,-20.217) 16.886,-20.285 16.885,-20.285 16.412,-20.759 ccw(c16.547,-20.894) 16.356,-20.894 ccw(c16.547,-20.894) 16.412,-21.029 16.919,-21.536 ccw(c17.629,-20.826) 17.629,-21.831 21.754,-21.831 ccw(c21.754,-21.783)
  region net +3V3: 21.754,-21.077 19.503,-21.077 cw(c19.503,-20.072) 19.453,-21.076 19.436,-21.072 19.34,-21.029 cw(c19.455,-20.77) 19.171,-20.77 19.171,-19.453 ccw(c18.983,-19.453) 18.983,-19.264 ccw(c18.983,-19.453) 18.795,-19.453 18.795,-21.106 cw(c18.51,-21.106) 18.51,-21.391 cw(c18.51,-21.106) 18.226,-21.106 18.226,-19.453 ccw(c18.038,-19.453) 18.038,-19.264 ccw(c18.038,-19.453) 17.85,-19.453 17.85,-21.106 cw(c17.566,-21.106) 17.566,-21.391 cw(c17.566,-21.106) 17.281,-21.106 17.281,-19.759 ccw(c17.093,-19.759) 17.093,-19.57 14.219,-19.57 cw(c14.219,-19.522) 14.171,-19.522 cw(c14.219,-19.522) 14.219,-19.474 17.093,-19.474 cw(c17.093,-19.759) 17.377,-19.759 17.377,-21.106 ccw(c17.566,-21.106) 17.566,-21.295 ccw(c17.566,-21.106) 17.754,-21.106 17.754,-19.453 cw(c18.038,-19.453) 18.038,-19.168 cw(c18.038,-19.453) 18.322,-19.453 18.322,-21.106 ccw(c18.51,-21.106) 18.51,-21.295 ccw(c18.51,-21.106) 18.699,-21.106 18.699,-19.453 cw(c18.983,-19.453) 18.983,-19.168 cw(c18.983,-19.453) 19.267,-19.453 19.267,-20.77 ccw(c19.455,-20.77) 19.379,-20.942 19.466,-20.981 19.503,-20.981 21.754,-20.981 cw(c21.754,-21.029)
  region net +3V3: 18.298,-22.734 cw(c18.106,-22.734) 17.915,-22.734 17.915,-22.118 ccw(c17.819,-22.118) 17.724,-22.118 17.724,-22.734 cw(c17.532,-22.734) 17.341,-22.734 17.341,-22.094 ccw(c17.245,-22.094) 17.149,-22.094 17.149,-22.734 cw(c16.958,-22.734) 16.766,-22.734 16.766,-21.778 ccw(c16.671,-21.778) 16.575,-21.778 16.575,-22.734 cw(c16.384,-22.734) 16.192,-22.734 16.192,-21.293 ccw(c16.097,-21.293) 16.001,-21.293 16.001,-22.734 cw(c15.81,-22.734) 15.618,-22.734 15.618,-21.643 ccw(c15.523,-21.643) 15.427,-21.643 15.427,-22.734 cw(c15.236,-22.734) 15.044,-22.734 15.044,-21.237 ccw(c14.949,-21.237) 14.853,-21.237 14.853,-22.393 cw(c14.661,-22.393) 14.661,-22.584 14.219,-22.584 cw(c14.219,-22.536) 14.171,-22.536 cw(c14.219,-22.536) 14.219,-22.488 14.661,-22.488 ccw(c14.661,-22.393) 14.757,-22.393 14.757,-21.237 cw(c14.949,-21.237) 15.14,-21.237 15.14,-22.734 ccw(c15.236,-22.734) 15.331,-22.734 15.331,-21.643 cw(c15.523,-21.643) 15.714,-21.643 15.714,-22.734 ccw(c15.81,-22.734) 15.905,-22.734 15.905,-21.293 cw(c16.097,-21.293) 16.288,-21.293 16.288,-22.734 ccw(c16.384,-22.734) 16.479,-22.734 16.479,-21.778 cw(c16.671,-21.778) 16.862,-21.778 16.862,-22.734 ccw(c16.958,-22.734) 17.053,-22.734 17.053,-22.094 cw(c17.245,-22.094) 17.437,-22.094 17.437,-22.734 ccw(c17.532,-22.734) 17.628,-22.734 17.628,-22.118 cw(c17.819,-22.118) 18.011,-22.118 18.011,-22.734 ccw(c18.106,-22.734) 18.202,-22.734 18.202,-22.118 cw(c18.393,-22.118) 18.585,-22.118 18.585,-22.393 ccw(c18.68,-22.393) 18.68,-22.488 21.754,-22.488 cw(c21.754,-22.536) 21.754,-22.584 18.68,-22.584 cw(c18.68,-22.393) 18.489,-22.393 18.489,-22.118 ccw(c18.393,-22.118) 18.298,-22.118
  region net GND: -22.3,-23.7 ccw(c-22.3,-24) -22.6,-24 -22.6,-25.3 ccw(c-22.3,-25.3) -22.3,-25.6 -21.4,-25.6 ccw(c-21.4,-25.3) -21.1,-25.3 -21.1,-24 ccw(c-21.4,-24) -21.4,-23.7
  region net GND: -9.4,-27.6 ccw(c-9.4,-27.8) -9.6,-27.8 -9.6,-29.559 ccw(c-9.259,-29.559) -9.5,-29.8 -8.3,-31 ccw(c-7.576,-30.276) -7.576,-31.3 -6.4,-31.3 ccw(c-6.4,-31.1) -6.2,-31.1 -6.2,-29.8 ccw(c-6.4,-29.8) -6.4,-29.6 -7.8,-29.6 cw(c-7.8,-29.1) -8.3,-29.1 -8.3,-27.8 ccw(c-8.5,-27.8) -8.5,-27.6
  region net GND: -9.5,-23.6 ccw(c-9.5,-23.8) -9.7,-23.8 -9.7,-25.3 ccw(c-9.5,-25.3) -9.5,-25.5 -8.3,-25.5 -3.3,-25.5 cw(c-3.3,-25.741) -3.129,-25.571 -3.071,-25.629 ccw(c-2.9,-25.459) -2.9,-25.7 -2.1,-25.7 -2.1,-25.4 -2.259,-25.4 cw(c-2.259,-25.059) -2.5,-25.3 -2.815,-24.985 -4.059,-23.741 ccw(c-4.4,-24.083) -4.4,-23.6
  region net NetC7_2: -3.202,-30.002 cw(c-2.775,-30.429) -2.775,-29.825 -2.1,-29.825 cw(c-2.1,-29.925) -2,-29.925 -2,-30.1 cw(c-2.1,-30.1) -2.1,-30.2 -2.8,-30.2 ccw(c-2.8,-30.4) -3,-30.4 -3,-31.1 cw(c-3.2,-31.1) -3.2,-31.3 -5.8,-31.3 cw(c-5.8,-31.1) -6,-31.1 -6,-29.8 cw(c-5.8,-29.8) -5.8,-29.6 -4.7,-29.6 cw(c-4.7,-29.8) -4.5,-29.8 -4.5,-30.2 ccw(c-4.3,-30.2) -4.3,-30.4 -3.741,-30.4 ccw(c-3.741,-30.059) -3.5,-30.3
  region net +VBUS: -4.638,-27.6 ccw(c-4.638,-27.322) -4.36,-27.322 -4.36,-26.904 cw(c-4.055,-26.905) -4.053,-26.6 -3.6,-26.6 cw(c-3.6,-26.841) -3.429,-26.671 -3,-27.1 ccw(c-2.759,-26.859) -2.759,-27.2 -2.2,-27.2 ccw(c-2.2,-27.1) -2.1,-27.1 -2.1,-26.1 ccw(c-2.3,-26.1) -2.3,-25.9 -3.1,-25.9 cw(c-3.1,-25.659) -3.271,-25.829 -3.3,-25.8 ccw(c-3.541,-26.041) -3.541,-25.7 -8.7,-25.7 ccw(c-8.7,-25.9) -8.9,-25.9 -8.9,-26.1 -8.9,-27 ccw(c-8.7,-27) -8.7,-27.2 -8.2,-27.2 cw(c-8.2,-27.4) -8,-27.4 -8,-29.1 ccw(c-7.8,-29.1) -7.8,-29.3 -6.7,-29.3 ccw(c-6.7,-29.1) -6.5,-29.1 -6.5,-27.8 cw(c-6.3,-27.8) -6.3,-27.6
  region net C: 1,-21.7 cw(c1.5,-21.7) 1.5,-21.2 cw(c1.5,-21.683) 1.841,-21.341 2.759,-22.259 cw(c2.417,-22.6) 2.9,-22.6 2.9,-22.9 cw(c2.7,-22.9) 2.7,-23.1 1.2,-23.1 cw(c1.2,-22.9) 1,-22.9
  region net NetR11_1: -0.5,-23.5 cw(c-0.3,-23.5) -0.3,-23.3 0.3,-23.3 cw(c0.3,-23.5) 0.5,-23.5 0.5,-25.1 cw(c0.3,-25.1) 0.3,-25.3 -0.3,-25.3 cw(c-0.3,-25.1) -0.5,-25.1
  region net NetR8_1: 1,-23.5 cw(c1.2,-23.5) 1.2,-23.3 1.8,-23.3 cw(c1.8,-23.5) 2,-23.5 2,-25.1 cw(c1.8,-25.1) 1.8,-25.3 1.2,-25.3 cw(c1.2,-25.1) 1,-25.1
  region net NetR12_1: -2,-23.5 cw(c-1.8,-23.5) -1.8,-23.3 -1.2,-23.3 cw(c-1.2,-23.5) -1,-23.5 -1,-25.1 cw(c-1.2,-25.1) -1.2,-25.3 -1.8,-25.3 cw(c-1.8,-25.1) -2,-25.1

## Silkscreen, mask and mechanical layers (free items; w line width, h text height)
Top Overlay:
  region: 358 vertices and 4 holes, not listed, extent -2.719,-18.581 2.737,-13.796
Bottom Overlay:
  drawing of 5 lines, arcs and shapes, not listed
  text ".PCB_Revision" at 18.1,-34.033 h1
Mechanical 1:
  the board outline again, w0.2

## Text inside footprints (layer, text, board x,y; h text height)
J1: Mechanical 13 "PCB edge" at -21.368,-34.793 h0.5